# EAGLE board part4a-clock-logic (EAGLE 9.7.0)

Size 204.25 x 67.94 mm. Coordinates in mm from the lower left corner, seen from the top.
Outline: 0,0 204.25,0 204.25,67.94 0,67.94 0,0
Copper layers (1*16): Top 0.035mm / dielectric 1.5mm / Bottom 0.035mm
Design rules "default": minimum track width 6mil, minimum drill 0.35mm, track to track 6mil, track to pad 6mil, pad to pad 6mil, via to via 6mil, smd to smd 6mil, copper to edge 40mil, drill to drill 6mil, minimum pad ring 10mil, minimum via ring 8mil, stop-mask expansion 4mil, vias tented up to drill 0mil, thermal gap 10mil

## Footprints (pad centres in the part's own frame; a part is rotated, then mirrored left to right if it is on the bottom)
CAP-THRU-2.54MM = drill 1.016 pad 1.88: 1 -1.27,0; 2 1.27,0
CAPPRD254W65D500H1150B = drill 0.85 pad 1.45: 1 -1.27,0; 2 1.27,0
LEDRD254W60D565H860B = drill 0.981 pad 1.581: 1 -1.27,0; 2 1.27,0
LEDRD254W60D565H860B_Y = drill 0.981 pad 1.581: 1 -1.27,0; 2 1.27,0
BATTERY-GENERIC = drill 1.118 pad 3.15 octagon: + 2.54,0; - -2.54,0
RESAD1016W63L850D250B = drill 0.83 pad 1.43: 1 -5.08,0; 2 5.08,0
HA-06-SM065 = drill 1 pad 1.676: 1 -2.54,-2.54; 2 0,2.54; 3 2.54,-2.54
SWITCH-SPDT-PTH-8.5X3.7MM = drill 1.016 pad 1.88: 1 -2.54,0; 2 0,0; 3 2.54,0
SWITCH-MOMENTARY-PTH-6.5MM = drill 1.016 pad 1.88: 1 -3.251,2.261; 2 3.251,2.261; 3 -3.251,-2.261; 4 3.251,-2.261
DIP762W53P254L1969H508Q14B = drill 0.743 pad 1.343: 1 -3.81,7.62; 2 -3.81,5.08; 3 -3.81,2.54; 4 -3.81,0; 5 -3.81,-2.54; 6 -3.81,-5.08; 7 -3.81,-7.62; 8 3.81,-7.62; 9 3.81,-5.08; 10 3.81,-2.54; 11 3.81,0; 12 3.81,2.54; 13 3.81,5.08; 14 3.81,7.62
DIP826W53P254L959H508Q8B = drill 0.786 pad 1.386: 1 -4.13,3.81; 2 -4.13,1.27; 3 -4.13,-1.27; 4 -4.13,-3.81; 5 4.13,-3.81; 6 4.13,-1.27; 7 4.13,1.27; 8 4.13,3.81

## Placement (x,y rotation side)
C8  0.1u  [CAP-THRU-2.54MM]  71.22,40.01 0 top
C9  0.1u  [CAP-THRU-2.54MM]  44.55,51.44 270 top
C10  1u  [CAPPRD254W65D500H1150B]  49.63,24.77 180 top
C11  0.1u  [CAP-THRU-2.54MM]  189.33,5.71 270 top
C12  0.1u  [CAP-THRU-2.54MM]  89,40.01 0 top
C13  100n  [CAP-THRU-2.54MM]  101.7,40.01 0 top
C14  0.1u  [CAP-THRU-2.54MM]  129.64,40.01 0 top
D4  RED  [LEDRD254W60D565H860B]  43.28,24.77 180 top
D5  YELLOW  [LEDRD254W60D565H860B_Y]  89,24.77 180 top
D6  YELLOW  [LEDRD254W60D565H860B_Y]  137.26,24.77 180 top
P2  BATTERYGENERIC  [BATTERY-GENERIC]  8.26,59.68 180 top
R10  1k  [RESAD1016W63L850D250B]  62.33,45.09 90 top
R11  220  [RESAD1016W63L850D250B]  42.01,12.06 90 top
R12  1k  [RESAD1016W63L850D250B]  49.63,37.47 0 top
R13  1k  [RESAD1016W63L850D250B]  80.11,9.53 90 top
R14  220  [RESAD1016W63L850D250B]  87.73,12.06 90 top
R15  1M  [RESAD1016W63L850D250B]  95.35,45.09 90 top
R16  220  [RESAD1016W63L850D250B]  135.99,12.06 90 top
R17  1k  [RESAD1016W63L850D250B]  123.29,9.53 90 top
R18  1k  [RESAD1016W63L850D250B]  128.37,9.53 90 top
RPOT1  1M  [HA-06-SM065]  47.09,42.55 0 top
S1  TOGGLE  [SWITCH-SPDT-PTH-8.5X3.7MM]  110.59,32.38 0 top
S3  SWITCH_MOMENTARY  [SWITCH-MOMENTARY-PTH-6.5MM]  77.57,28.57 90 top
S4  TOGGLE  [SWITCH-SPDT-PTH-8.5X3.7MM]  110.59,22.23 0 top
U4  74HC04_PDIP  [DIP762W53P254L1969H508Q14B]  169.01,28.57 90 top
U5  74HC32_PDIP  [DIP762W53P254L1969H508Q14B]  189.33,28.57 90 top
U6  74HC08_PDIP  [DIP762W53P254L1969H508Q14B]  148.69,28.57 90 top
U7  LM555_DIP  [DIP826W53P254L959H508Q8B]  63.6,28.57 90 top
U8  LM555_DIP  [DIP826W53P254L959H508Q8B]  96.62,28.57 90 top
U9  LM555_DIP  [DIP826W53P254L959H508Q8B]  124.56,28.57 90 top

## Library data of the parts
C8-C14 P2 R10-R18 RPOT1 S1 S3 S4 U4-U6 = Tinkercad
D4 = Tinkercad; CATEGORY: Opto-Electronic; SUB-CATEGORY: LED; VALUE: LED_RED
D5 D6 = Tinkercad; CATEGORY: Opto-Electronic; SUB-CATEGORY: LED; VALUE: LED_YELLOW
U7-U9 = Tinkercad; CATEGORY: IC_Clock-Timing; CURRENT-SUPPLY: 10mA; DESCRIPTION: IC OSC SINGLE TIMER 100KHZ 8-DIP; FREQUENCY: 100kHz; MANUFACTURER: Texas Instruments; MPN: LM555CN/NOPB; OPERATING_TEMP: 0°C to 70°C; PART_STATUS: Active; ROHS_COMPLIANT: ROHS3 Compliant; SUB-CATEGORY: Timer

## Nets
P2+: C9.2 C11.2 P2.+ R10.2 R13.1 R15.2 R17.1 R18.1 U4.14 U5.14 U6.14 U7.4 U7.8 U8.4 U8.8 U9.8
P2-: C8.2 C9.1 C10.2 C11.1 C12.1 C13.2 C14.2 P2.- R11.1 R14.1 R16.1 S1.2 S3.1 S3.2 S4.2 U4.7 U5.7 U6.7 U7.1 U8.1 U9.1
RPOT1_P$1: R12.1 RPOT1.1
U4_1Y: U4.2 U6.4
U4_2Y: U4.4 U6.10
U6_1A: D4.2 R11.2 U6.1
U6_1B: D6.2 R16.2 U4.1 U6.2
U6_1Y: U5.1 U6.3
U6_2B: D5.2 R14.2 U6.5
U6_2Y: U5.2 U6.6
U6_3A: U5.3 U6.9
U7_CV: C8.1 U7.5
U7_DIS: R10.1 R12.2 U7.7
U7_OUT: D4.1 U7.3
U7_TR: C10.1 RPOT1.2 U7.2 U7.6
U8_CV: C13.1 U8.5
U8_DIS: C12.2 R15.1 U8.6 U8.7
U8_OUT: D5.1 U8.3
U8_TR: R13.2 S3.3 S3.4 U8.2
U9_!RST: R18.2 S4.1 U9.4
U9_CV: C14.1 U9.5
U9_OUT: D6.1 U9.3
U9_TR: R17.2 S4.3 U9.2

## Tracks (layer width: path | path; a pad name or v marks a point on that pad's centre or on a via)
P2+  (15 unrouted)
P2-  (20 unrouted)
RPOT1_P$1  (1 unrouted)
U4_1Y  (1 unrouted)
U4_2Y  (1 unrouted)
U6_1A  (2 unrouted)
U6_1B  (3 unrouted)
U6_1Y  (1 unrouted)
U6_2B  (2 unrouted)
U6_2Y  (1 unrouted)
U6_3A  (1 unrouted)
U7_CV  (1 unrouted)
U7_DIS  (2 unrouted)
U7_OUT  (1 unrouted)
U7_TR  (3 unrouted)
U8_CV  (1 unrouted)
U8_DIS  (3 unrouted)
U8_OUT  (1 unrouted)
U8_TR  (3 unrouted)
U9_!RST  (2 unrouted)
U9_CV  (1 unrouted)
U9_OUT  (1 unrouted)
U9_TR  (2 unrouted)